# EAGLE board esp32 nfc pcb (EAGLE 9.7.0)
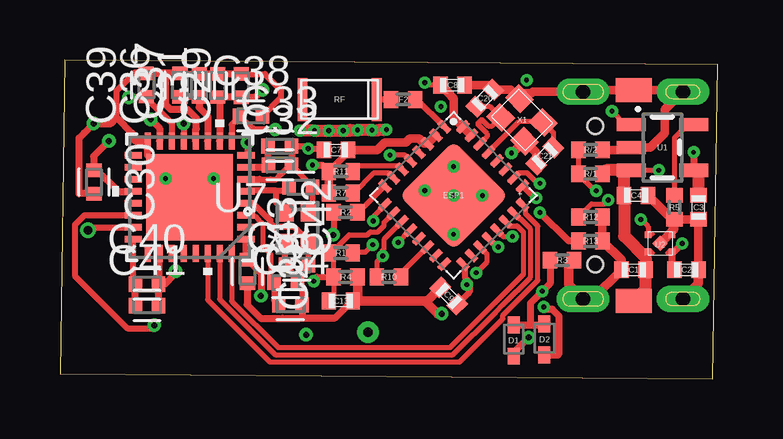
[diagram p0: board, top side]
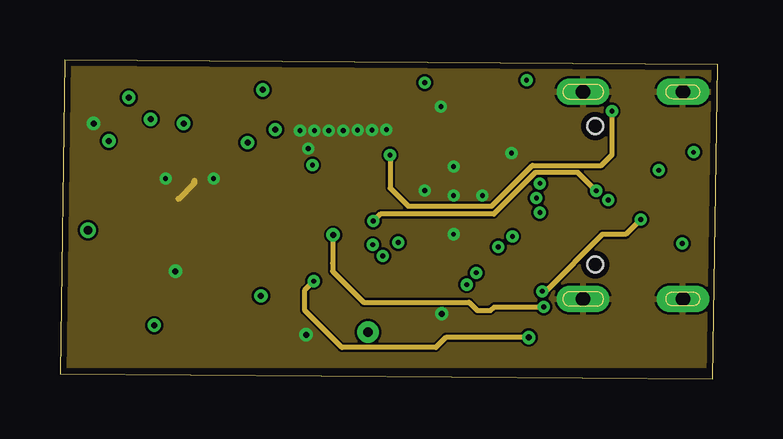
[diagram p1: board, inner layer Route2]
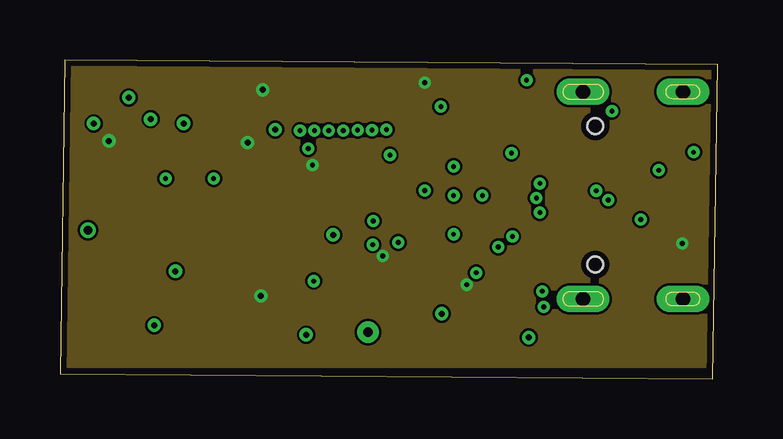
[diagram p2: board, inner layer Route14]
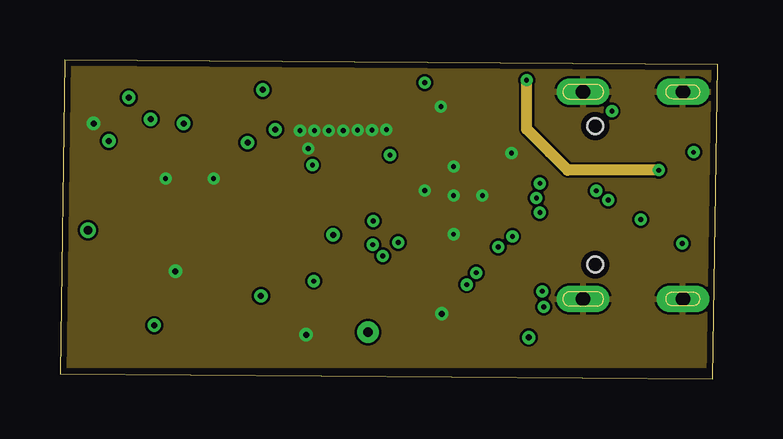
[diagram p3: board, inner layer Route15]
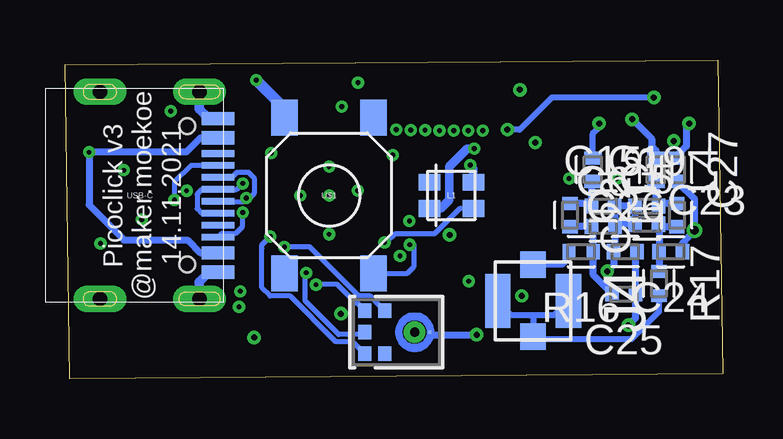
[diagram p4: board, bottom side, seen from below]

Size 27.4 x 13.3 mm. Coordinates in mm from the lower left corner, seen from the top.
Outline: 0.2,13.3 0,0.2 27.2,0 27.4,13.1 0.2,13.3
Copper layers (1+2*15+16): Top 0.035mm / dielectric 0.2mm / Route2 0.0175mm / dielectric 0.265mm / Route15 0.0175mm / dielectric 0.2mm / Bottom 0.035mm
Design rules "2020.08.24_4layers_eagle *": minimum track width 6mil, minimum drill 0.2mm, track to track 0.1mm, track to pad 0.1mm, pad to pad 0.1mm, via to via 0.1mm, smd to smd 0.1mm, copper to edge 10mil, drill to drill 6mil, minimum pad ring 10mil, minimum via ring 6mil, stop-mask expansion 0mil, vias tented up to drill 0.5mm, thermal gap 4mil

## Footprints (pad centres in the part's own frame; a part is rotated, then mirrored left to right if it is on the bottom)
SOLDERPAD_1.5X1.0 = smd 1 x 1.5: 1 0,0
C0402_S = smd 0.6 x 0.7: P$1 -0.5,0; P$2 0.5,0
CAPC1005X60 = smd 0.56 x 0.629: 1 -0.485,0; 2 0.485,0
SOD523 = smd 0.7 x 0.5: A 0.7,0; C -0.6,0
QFN32 = smd 0.6 x 0.275: 1 -2.3,1.75; 2 -2.3,1.25; 3 -2.3,0.75; 4 -2.3,0.25; 5 -2.3,-0.25; 6 -2.3,-0.75; 7 -2.3,-1.25; 8 -2.3,-1.75; 17 2.3,-1.75; 18 2.3,-1.25; 19 2.3,-0.75; 20 2.3,-0.25; 21 2.3,0.25; 22 2.3,0.75; 23 2.3,1.25; 24 2.3,1.75 | smd 0.275 x 0.6: 9 -1.75,-2.3; 10 -1.25,-2.3; 11 -0.75,-2.3; 12 -0.25,-2.3; 13 0.25,-2.3; 14 0.75,-2.3; 15 1.25,-2.3; 16 1.75,-2.3; 25 1.75,2.3; 26 1.25,2.3; 27 0.75,2.3; 28 0.25,2.3; 29 -0.25,2.3; 30 -0.75,2.3; 31 -1.25,2.3; 32 -1.75,2.3 | smd 3.2 x 3.2: EXP 0,0
R0402 = smd 0.6 x 0.7: 1 -0.5,0; 2 0.5,0
A-1JB = smd 1.1 x 1.05: 1 1.5,0; 2_1 -1.5,0 | smd 2.25 x 1.05: 2_0 0,1.475; 2_2 0,-1.475
WS2812_2020 = smd 0.9 x 0.7: DI -0.915,0.55; DO 0.915,-0.55; GND 0.915,0.55; VDD -0.915,-0.55
INDC1006X60N = smd 0.56 x 0.729: 1 -0.485,0; 2 0.485,0
SPH0645LM4H-B_KNO = smd 0.533 x 0.61: 1 1.31,0.9; 2 0.489,0.889; 4 0.489,-0.889; 5 1.31,-0.9; 6 1.31,0 | smd 0.127 x 0.127: 3 -1.397,0 | drill 0.381 pad 0.381: 7 -0.763,0
RESC1005X40 = smd 0.535 x 0.644: 1 -0.507,0; 2 0.507,0
ANT3216LL00R2400A = smd 1.8 x 0.4: P1 0,1.55; P2 0,-1.55
SOT23-5 = smd 0.55 x 1.2: 1 -0.95,-1.3; 2 0,-1.3; 3 0.95,-1.3; 4 0.95,1.3; 5 -0.95,1.3
TDFN4 = smd 0.48 x 0.48 rotated 45: EXP 0,0 | smd 0.25 x 0.3: P1 -0.35,-0.5; P2 0.35,-0.5; P3 0.35,0.5; P4 -0.35,0.5
SMD04_NX2016S_NDK = smd 0.762 x 0.838: 1 -0.525,0.675; 2 -0.525,-0.675; 3 0.525,-0.675; 4 0.525,0.675
VFQFPN32_5X5_WETTABLE_STM-L = smd 0.711 x 0.254: 1 -2.349,1.75; 2 -2.349,1.25; 3 -2.349,0.75; 4 -2.349,0.25; 5 -2.349,-0.25; 6 -2.349,-0.75; 7 -2.349,-1.25; 8 -2.349,-1.75; 17 2.349,-1.75; 18 2.349,-1.25; 19 2.349,-0.75; 20 2.349,-0.25; 21 2.349,0.25; 22 2.349,0.75; 23 2.349,1.25; 24 2.349,1.75 | smd 0.254 x 0.711: 9 -1.75,-2.349; 10 -1.25,-2.349; 11 -0.75,-2.349; 12 -0.25,-2.349; 13 0.25,-2.349; 14 0.75,-2.349; 15 1.25,-2.349; 16 1.75,-2.349; 25 1.75,2.349; 26 1.25,2.349; 27 0.75,2.349; 28 0.25,2.349; 29 -0.25,2.349; 30 -0.75,2.349; 31 -1.25,2.349; 32 -1.75,2.349 | smd 3.607 x 3.607: 33 0,0
BUTTON_ST-1187-3 = smd 1.5 x 1.1: P1 -3.25,1.85; P2 3.25,1.85; P3 -3.25,-1.85; P4 3.25,-1.85
USBC_C393939 = smd 0.55 x 1.35: A1B12 -3.2,0.775; A4B9 -2.4,0.775; B1A12 3.2,0.775; B4A9 2.4,0.775 | smd 0.275 x 1.35: A5 -1.25,0.775; A6 -0.25,0.775; A7 0.25,0.775; B5 1.75,0.775; B6 0.75,0.775; B7 -0.75,0.775; B8 1.25,0.775 | smd 0.3 x 1.35: A8 -1.75,0.775 | drill 0.6 pad 1 long: S1 -4.32,0; S2 4.32,0; S3 -4.32,-4.15; S4 4.32,-4.15 | hole 0.65: 2.89,-0.5; -2.89,-0.5
XTYL_2016 = smd 0.9 x 0.8: P1 -0.7,-0.55; P2 0.7,-0.55; P3 0.7,0.55; P4 -0.7,0.55

## Placement (x,y rotation side)
BAT+  TP/SP-1.5X1.0  [SOLDERPAD_1.5X1.0]  23.9,3.25 90 top
BAT-  TP/SP-1.5X1.0  [SOLDERPAD_1.5X1.0]  23.9,12.05 90 top
C1  1µ  [C0402_S]  23.9,4.55 0 top
C2  1µ  [C0402_S]  26.1,4.55 180 top
C3  1µ  [C0402_S]  26.6,7.15 90 top
C4  1µ  [C0402_S]  24,7.65 180 top
C5  [CAPC1005X60]  3.16,6.45 0 bottom
C6  [CAPC1005X60]  4.97,6.36 0 bottom
C7  10µ  [C0402_S]  11.5,9.55 0 top
C8  0,1µ  [C0402_S]  16.35,12.25 180 top
C9  0,1µ  [C0402_S]  16.2,3.45 315 top
C13  1µ  [C0402_S]  11.7,3.25 180 top
C15  [CAPC1005X60]  4.98,7.2 0 bottom
C19  [CAPC1005X60]  3.16,7.2 0 bottom
C20  10p  [C0402_S]  17.7,11.7 225 top
C21  10p  [C0402_S]  20.2,9.3 45 top
C22  [CAPC1005X60]  6.36,6.83 270 bottom
C23  [CAPC1005X60]  1.91,6.83 270 bottom
C24  [CAPC1005X60]  2.17,5.3 180 bottom
C25  [CAPC1005X60]  4.12,3.54 180 bottom
C26  [CAPC1005X60]  4.06,5.3 0 bottom
C27  [CAPC1005X60]  1.91,8.72 270 bottom
C28  [CAPC1005X60]  7.81,4.48 270 top
C29  [CAPC1005X60]  7.55,12.23 90 top
C30  [CAPC1005X60]  1.42,8.21 270 top
C31  [CAPC1005X60]  6.57,12.23 90 top
C32  [CAPC1005X60]  9.16,8.92 0 top
C33  [CAPC1005X60]  9.15,9.7 0 top
C34  10n  [CAPC1005X60]  9.6,3.09 0 top
C35  [CAPC1005X60]  9.41,4.01 0 top
C36  [CAPC1005X60]  5,12.24 90 top
C37  [CAPC1005X60]  5.8,12.24 90 top
C38  [CAPC1005X60]  7.95,10.96 0 top
C39  [CAPC1005X60]  3.6,12.25 90 top
C40  [CAPC1005X60]  3.62,3.95 0 top
C41  [CAPC1005X60]  3.62,3.05 0 top
C42  [CAPC1005X60]  10.04,7.99 180 top
C43  [CAPC1005X60]  9.87,4.74 0 top
D1  4148  [SOD523]  18.9,1.65 270 top
D2  4148  [SOD523]  20.19,1.69 270 top
ESP1  ESP32_C3_QFN32  [QFN32]  16.4,7.65 315 top
F2  0  [R0402]  14.3,11.65 180 top
J4  UMC-JACK  [A-1JB]  7.9,3.25 90 bottom
L1  WS2812_2020  [WS2812_2020]  11.3,7.65 180 bottom
L3  [INDC1006X60N]  5.41,8.72 270 bottom
L4  [INDC1006X60N]  2.78,8.72 270 bottom
MIC1  SPH0645LM4H-BSPH0645LM4H-B_KNO  [SPH0645LM4H-B_KNO]  13.6,1.95 180 bottom
R1  1k  [R0402]  11.7,5.25 0 top
R2  1k  [R0402]  11.9,6.95 0 top
R3  1M  [R0402]  20.92,4.95 180 top
R4  10k  [R0402]  11.9,4.25 180 top
R5  47.5k  [R0402]  25.6,7.15 270 top
R7  10k  [R0402]  11.7,7.75 0 top
R10  10k  [R0402]  13.7,4.25 0 top
R11  10k  [R0402]  11.7,8.65 0 top
R12  5.1k  [R0402]  22.1,6.75 0 top
R13  5.1k  [R0402]  22.1,5.75 0 top
R16  [RESC1005X40]  5.9,5.3 180 bottom
R17  [RESC1005X40]  2.66,3.97 270 bottom
R/1  1M  [R0402]  22.1,8.55 180 top
R/2  250k  [R0402]  22.1,9.55 0 top
RF  ANT3216LL00R2400A  [ANT3216LL00R2400A]  11.65,11.65 270 top
U1  BRCL4054BME  [SOT23-5]  25.1,9.65 270 top
U2  MIC5504  [TDFN4]  25,5.65 90 top
U3  NX2016SA-27.12MHZ-EXS00A-CS113SMD04_NX2016S_NDK  [SMD04_NX2016S_NDK]  9.89,6.3 0 top
U7  ST25R3916B-AQWTVFQFPN32_5X5_WETTABLE_STM-L  [VFQFPN32_5X5_WETTABLE_STM-L]  5.4,7.57 180 top
U$1  BUTTON_ST-1187-3  [BUTTON_ST-1187-3]  16.4,7.65 90 bottom
USB-C  USB_C_C393939  [USBC_C393939]  21.8,7.65 270 bottom
X1  XTAL_2016  [XTYL_2016]  19.25,10.8 315 top

## Library data of the parts
BAT+ BAT- = iml_elc
C1-C4 C7-C9 C13 C20 C21 ESP1 F2 L1 R1-R5 R7 R10-R13 R/1 R/2 RF U1 U2 U$1 USB-C X1 = moekoe
C5 C6 C15 C19 C22-C43 = Capacitor; CATEGORY: Capacitor
D1 D2 = diode
J4 = Connector; CATEGORY: RF Connectors / Coaxial Connectors; DESCRIPTION: RF Connectors / Coaxial Connectors AMC PCB JACK S/M T&R U.FL Compatible; MANUFACTURER: Amphenol RF; MPN: A-1JB; OPERATING_TEMPERATURE: 40°C TO +90°C; PART_STATUS: Active; PITCH: -; ROHS_COMPLIANCE: RoHS3 Compliant; SERIES: AMC; SUBCATEGORY: RF Connectors / Coaxial Connectors; TYPE: Jack, Male Pin, Surface Mount
L3 L4 = Inductor; CATEGORY: Inductor; SUB-CATEGORY: Fixed
MIC1 = 2024-08-21_16-21-19_Library; COPYRIGHT: Copyright (C) 2024 Ultra Librarian. All rights reserved.; MANUFACTURER_PART_NUMBER: SPH0645LM4H-B; MFR_NAME: Knowles
R16 R17 = Resistor; CATEGORY: Resistor; SUB-CATEGORY: Fixed
U3 = 2024-08-20_22-07-07_Library; COPYRIGHT: Copyright (C) 2024 Ultra Librarian. All rights reserved.; MANUFACTURER_PART_NUMBER: NX2016SA-27.12MHZ-EXS00A-CS11337; MFR_NAME: NDK
U7 = Library; COPYRIGHT: Copyright (C) 2024 Ultra Librarian. All rights reserved.; MANUFACTURER_PART_NUMBER: ST25R3916B-AQWT; MFR_NAME: STMicroelectronics; TYPE: RFID, RF Access, Monitoring ICs

## Nets
+3V3: C2.P$2 C7.P$2 C8.P$2 C9.P$2 C28.1 C29.1 C30.1 C31.1 ESP1.2 ESP1.3 ESP1.11 ESP1.17 ESP1.31 ESP1.32 L1.VDD MIC1.5 R7.1 R10.1 R11.1 U2.P1 U7.1 U7.8 U7.10 U7.20
+VBAT: BAT+.1 C1.P$2 C4.P$2 R/1.1 U1.3 U2.P4 U$1.P2
ADC: ESP1.9 R/1.2 R/2.1
BUTTON: C13.P$2 D1.A ESP1.10 R1.1 R4.2
DIN: ESP1.12 L1.DI
EN: ESP1.7 R7.2
EN_LDO: D1.C D2.C R3.2 U2.P3
GND: BAT-.1 C1.P$1 C2.P$1 C3.P$1 C4.P$1 C5.1 C6.2 C7.P$1 C8.P$1 C9.P$1 C13.P$1 C15.2 C19.1 C20.P$1 C21.P$1 C26.1 C27.1 C28.2 C29.2 C30.2 C31.2 C32.2 C33.2 C34.2 C35.2 C36.2 C37.2 C38.2 C39.2 C40.2 C41.2 C42.1 C43.1 ESP1.EXP L1.GND MIC1.3 R3.1 R4.1 R5.2 R12.2 R13.2 R/2.2 U1.2 U2.EXP U2.P2 U3.2 U3.4 U7.6 U7.12 U7.16 U7.26 U7.33 USB-C.A1B12 USB-C.B1A12 USB-C.S1 USB-C.S2 USB-C.S3 USB-C.S4 X1.P2 X1.P4
GPIO2: ESP1.6 R11.2
GPIO8: ESP1.14 R10.2
GPIO9: ESP1.15
GPIO10: ESP1.16
GPIO18: ESP1.25 USB-C.A7 USB-C.B7
GPIO19: ESP1.26 USB-C.A6 USB-C.B6
LATCH: ESP1.8 R2.2
MISO/SDA: ESP1.22 U7.32
MOSI: ESP1.23 U7.31
N$1: R1.2 U$1.P3
N$2: C19.2 C23.1 L4.2
N$3: C42.2 U3.1 U7.5
N$4: ESP1.1 F2.1
N$5: C15.1 C22.1 L3.2
N$6: F2.2 RF.P1
N$7: C32.1 C33.1 U7.7
N$8: C5.2 C23.2 C24.2 R17.1
N$9: C6.1 C22.2 C25.2 R16.1
N$16: D2.A R2.1
N$18: R13.1 USB-C.B5
N$23: R5.1 U1.5
N$25: R12.1 USB-C.A5
N$26: C20.P$2 ESP1.30 X1.P1
N$27: C21.P$2 ESP1.29 X1.P3
N$29: C34.1 C35.1 U7.3
N$31: C36.1 C37.1 U7.11
N$32: J4.1 R16.2
N$33: C38.1 C39.1 U7.9 U7.14
N$36: C43.2 U3.3 U7.4
N$37: J4.2_0 J4.2_1 J4.2_2 R17.2
N$38: C40.1 C41.1 U7.24
RFL1: C25.1 C26.2 U7.22
RFL2: C24.1 C27.2 U7.23
RFO1: L3.1 U7.13
RFO2: L4.1 U7.15
RX: ESP1.27
SCLK/SCL: ESP1.24 U7.30
SPICSO: ESP1.21 MIC1.1
SPIHD: ESP1.19 MIC1.6
SPIWP: ESP1.20 MIC1.4
STAT_MCP: ESP1.5 U1.1
TX: ESP1.28
VPP: C3.P$2 U1.4 USB-C.A4B9 USB-C.B4A9

## Tracks (layer width: path | path; a pad name or v marks a point on that pad's centre or on a via)
+3V3  (via drill 0.2, 0.25)
  Top 0.2: C8.P$2 15.3,12.25 v15.2,12.35 | R10.1 13.2,4.87 v13.45,5.12 13.45,5.36 13.49,5.4 13.49,5.8 ESP1.11
  Top 0.25: v7.81,9.85 7.81,9.38 U7.8 | C28.1 7.75,5.03 U7.1 | 17.08,4.02 16.87,4.23 16.87,4.71 ESP1.17 | 17.08,4.02 16.99,3.93 v16.95,3.93 | 17.08,4.02 17.08,3.65 17.02,3.58 17.02,3.56 C9.P$2
  Top 0.3: C2.P$2 25.5,4.65 U2.P1 25.57,5.3 v25.92,5.65 | v10.52,8.91 10.94,8.91 R11.1 11.9,9.35 11.9,9.55 | 6.57,11.87 C31.1 | C31.1 | 6.57,11.87 C31.1 | 6.57,11.87 6.65,11.79 | 6.65,11.79 U7.10 | 6.65,11.79 6.7,11.74 C29.1 8.13,11.74 v8.45,12.05 | v2.04,9.92 1.4,9.29 1.4,8.71 C30.1 1.56,8.69 2.4,7.85 2.43,7.82 U7.20 | v8.37,3.46 8.37,3.64 8.38,3.64 8.38,4.4 C28.1
  Top 0.35: 14.97,10.02 14.57,10.02 14.4,9.85 13.98,9.85 13.97,9.86 13.53,9.86 13.52,9.85 13.22,9.55 C7.P$2 11.9,9.55
  Top 0.352: 25.5,4.65 C2.P$2 | ESP1.31 ESP1.32 16.45,10.85 16.4,10.85 16.4,11.45 16.4,11.69 16.27,11.82 16.27,11.83 C8.P$2 | ESP1.2 ESP1.3 15.18,9.81 14.97,10.02 | R11.1 R7.1
  Bottom 0.2: MIC1.5 15.21,3.15 15.28,3.15 16.05,3.93 v16.95,3.93
  Bottom 0.35: v10.52,8.91 10.38,8.78 L1.VDD
  pour Route14: 0.35,0.6 27.25,0.6 27.25,13.1 0.35,13.1
+VBAT  (via drill 0.2)
  Top 0.2: 24,8.7 v24.95,8.7
  Top 0.3: U2.P4 24.5,4.65 C1.P$2
  Top 0.4: U1.3 24,8.7
  Top 0.5: BAT+.1 24.4,3.75 C1.P$2 24.4,5.05 23.5,5.95 C4.P$2 23.5,8.6 23.4,8.7 | 23.4,8.7 22.75,8.7 R/1.1 | U1.3 23.4,8.7
  Route15 0.45: v24.95,8.7 21.15,8.7 20.4,9.45 19.44,10.41 v19.44,12.45
  Bottom 0.45: v19.44,12.45 18.25,11.26 U$1.P2
ADC  (via drill 0.2)
  Top 0.2: R/2.1 R/1.2 22.31,7.84 v22.34,7.84 | ESP1.9 13.05,6.78 v13.05,6.58
  Route2 0.2: v13.05,6.58 13.35,6.87 18.08,6.87 19.81,8.6 21.58,8.6 v22.34,7.84
BUTTON  (via drill 0.2, 0.25)
  Top 0.2: C13.P$2 11.4,3.45 R4.2 11.4,5.05 R1.1 11.45,5.5 11.55,5.5 12.05,6 12.81,6 12.93,6.12 13.24,6.12 13.5,6.39 13.5,6.52 ESP1.10
  Top 0.25: v10.57,4.07 10.57,4.11 10.71,4.25 R4.2
  Top 0.3: v19.53,1.72 18.9,1.1 D1.A
  Route2 0.2: v10.57,4.07 10.2,3.7 10.2,2.85 11.75,1.3 15.66,1.3 16.08,1.72 v19.53,1.72
DIN  (via drill 0.2)
  Top 0.2: ESP1.12 v14.09,5.69
  Bottom 0.2: v14.09,5.69 14.01,5.69 13.65,6.05 12.01,6.05 10.96,7.1 L1.DI
EN
  Top 0.2: R7.2 12.23,7.75 13.05,8.57 13.71,8.57 ESP1.7
EN_LDO  (via drill 0.2)
  Top 0.2: U2.P3 24.5,6.35 v24.2,6.65
  Top 0.3: D2.C 20.14,2.25 19.6,2.25 | D1.C 19.6,2.25 | R3.2 20.42,3.98 v20.1,3.65 19.6,3.15 19.6,2.25
  Route2 0.2: v24.2,6.65 23.57,6.02 22.6,6.02 20.23,3.65 v20.1,3.65
GND  (via drill 0.2, 0.25)
  Top 0.2: 9.89,4.23 C35.2 | 9.6,8.92 C32.2
  Top 0.25: C29.2 8.54,12.71 9.2,12.05 9.2,11.72 C38.2 | 2.36,10.89 2.36,12.01 3.09,12.74 | C33.2 10.25,9.7 v10.35,9.6 10.95,9.6 | C40.2 4.15,3.99 U7.26 | 8.31,8.32 8.77,8.32 9,8.32 9.21,8.53 9.6,8.92 | U3.4 10.52,7.08 C42.1 10.52,8.05 C32.2 | U3.2 9.38,5.61 C43.1 9.89,4.23 C35.2 10.08,3.82 C34.2 | C36.2 C37.2
  Top 0.3: U2.P2 25.5,6.35 25.6,6.45 | C33.2 9.65,9.69 C32.2 | U7.6 8.31,8.32 | C28.2 7.8,3.08 8.36,2.52 9.27,2.52 10,2.52 | C41.2 C40.2 4.35,3.95 4.81,4.4 v4.81,4.49 | 10.95,9.6 C7.P$1 | C36.2 5,12.84 C36.2 | C37.2 | 4.2,12.74 4.4,12.74 4.4,11.44 4.61,11.23 5.32,11.23 5.68,10.87 5.68,10.43 5.65,10.4 U7.12 | C39.2 3.09,12.74 | C37.2 C31.2 C29.2 | C30.2 0.8,7.72 0.8,10.05 1,10.25 v1.4,10.65 2.13,10.65 2.36,10.89 3,10.25 3,10.05 3.13,9.92 U7.16 3.65,9.53 3.66,9.52 3.66,9.31 U7.33 | C13.P$1 12.17,3.25 11.57,2.65 11.44,2.52 10,2.52 | 4.2,12.74 C36.2 | C37.2 | C39.2 4.2,12.74 | C36.2 C39.2 | C34.2 10.08,2.61 10,2.52
  Top 0.352: C2.P$1 C3.P$1 R5.2 | R5.2 25.5,6.65 C4.P$1 | R5.2 25.6,6.45 25.6,6.25 U2.EXP | 24.2,12.05 BAT-.1 | 24.2,12.05 25.87,12.05 USB-C.S3 25.2,11.22 25.2,10.25 24.6,9.65 U1.2 23.7,9.55 R/2.2 | C1.P$1 23.4,4.95 R13.2 R12.2 | C21.P$1 19.85,9.43 X1.P2 18.85,9.41 v18.81,9.41 | 24.2,12.05 21.88,12.05 USB-C.S1 19.71,11.97 19.66,11.92 19.38,11.92 X1.P4 18.77,12.05 C20.P$1 17.86,12.25 C8.P$1
  Top 0.4: R4.1 12.4,3.45 C13.P$1 15.2,3.25 | C2.P$1 26.6,3.98 USB-C.S4 | C1.P$1 22.18,3.33 USB-C.S2 21.2,3.93 21.2,4.25 21.2,4.73 R3.1 | 15.2,3.25 15.29,3.25 C9.P$1 | v15.9,2.72 15.73,2.72 15.2,3.25
  Top 0.5: v10,10.35 v10.6,10.35 v11.2,10.35 v11.8,10.35 12.06,10.35 12.08,10.38 v12.4,10.38 | v13,10.38 | v13,10.38 13.3,10.38 13.31,10.39 v13.6,10.39 | v12.4,10.38 | v13,10.38 v12.4,10.38
  Route2 0.25: 4.94,7.51 5.6,8.17 5.6,8.25
  Bottom 0.3: 4.4,6.45 C5.1 C19.1 C15.2 4.5,6.55 4.4,6.45 | 4.4,6.45 C6.2 4.49,5.35 C26.1 4.54,4.75 v4.81,4.49 | v1.4,10.65 1.51,10.54 1.51,9.7 1.91,9.3 C27.1 | MIC1.3 12.09,1.84 v10.26,1.84
  Bottom 0.35: L1.GND 11.75,7.1 11.6,7.25 11.4,7.45 11.4,8.85 10.65,9.6 v10.35,9.6
  Bottom 0.4: USB-C.S1 21.8,11.25 21.6,11.05 21.4,10.85 USB-C.A1B12 | USB-C.S2 21.8,4.05 21.4,4.45 USB-C.B1A12
  other vias: 16.4,7.65 16.4,8.85 17.6,7.65 15.2,7.85 15.87,11.35 16.4,6.03 6.4,8.35 4.4,8.35
  pour Route2: 0.28,0.53 27.32,0.53 27.32,13.17 0.28,13.17
  pour Route15: 0.28,0.53 27.32,0.53 27.32,13.17 0.28,13.17
GPIO2
  Top 0.2: R11.2 12.43,8.88 14.11,8.88 ESP1.6
GPIO8
  Top 0.2: ESP1.14 14.2,4.39 R10.2
GPIO18  (via drill 0.2)
  Top 0.2: ESP1.25 19.76,7.55 v19.85,7.55
  Bottom 0.2: USB-C.A7 19.85,7.4 | 19.85,7.4 19.5,7.75 19.5,8.35 19.75,8.6 20.25,8.6 20.45,8.4 USB-C.B7 | 19.85,7.4 v19.85,7.55
GPIO19  (via drill 0.2)
  Top 0.2: ESP1.26 19.12,8.6 19.45,8.6 19.9,8.15 v20,8.15
  Bottom 0.2: USB-C.B6 21.7,6.9 21.9,7.1 21.9,7.7 21.7,7.9 USB-C.A6 20.25,7.9 v20,8.15
LATCH
  Top 0.2: ESP1.8 12.45,6.95 R2.2
MISO/SDA
  Top 0.2: U7.32 7.15,3.24 9.09,1.3 15.66,1.3 16.25,1.3 17.85,2.9 18.35,3.4 18.6,3.65 | ESP1.22 18.73,6.38 19.04,6.38 19.31,6.12 19.31,5.85 | 19.31,5.85 19.31,5.74 | 19.31,5.85 19.31,4.36 19.2,4.25 18.6,3.65 | 18.6,3.65 18.55,3.6
MOSI
  Top 0.2: U7.31 6.65,3.31 8.96,1 16.38,1 18.15,2.78 18.47,3.1 19.61,4.23 19.61,6.24 19.17,6.68 19.13,6.68 ESP1.23
N$1  (via drill 0.2)
  Top 0.2: R1.2 12.23,5.28 12.73,5.28 v13.04,5.59
  Bottom 0.2: U$1.P3 13.15,4.4 12.86,4.69 12.86,5.59 v13.04,5.59
N$2
  Bottom 0.3: C23.1 2.57,7.31 C19.2 2.78,7.31 L4.2
N$3
  Top 0.25: 9,7.85 9,7.37 9.37,7 U3.1 | U7.5 7.78,7.85 9,7.85 | C42.2 9.41,7.85 9,7.85
N$4
  Top 0.25: ESP1.1 14.87,11.65 F2.1
N$5
  Bottom 0.3: L3.2 5.47,8.18 C15.1 5.58,7.31 C22.1
N$6
  Top 0.25: F2.2 RF.P1
N$7
  Top 0.3: C33.1 8.68,9.69 C32.1 8.58,8.82 U7.7
N$8
  Bottom 0.3: C23.2 2.57,6.34 C5.2 2.65,6.42 C24.2 R17.1
N$9
  Bottom 0.3: C22.2 6.35,6.36 C6.1 5.39,6.29 R16.1 5.39,5.13 5.39,4.32 C25.2
N$16  (via drill 0.2, 0.25)
  Top 0.25: R2.1 11.4,6.03 v11.38,6.01 | v11.38,6.01
  Top 0.3: D2.A 20.74,0.99 20.8,1.05 20.8,2.61 20.51,2.89 20.25,2.89 v20.15,3
  Route2 0.152: v11.38,6.01 11.36,5.99
  Route2 0.2: 11.36,5.99 11.36,4.81 11.36,4.49 12.66,3.19 17.05,3.19 17.4,2.85 17.94,2.85 18.09,3 v20.15,3
N$18  (via drill 0.2)
  Top 0.3: R13.1 21.19,5.75 v20,6.94
  Bottom 0.2: 20.46,5.9 USB-C.B5 20.86,6.06 20.3,6.06 20,6.36 v20,6.94
N$23
  Top 0.2: U1.5 26.15,10.6 25.6,10.05 R5.1
N$25  (via drill 0.2)
  Top 0.2: R12.1 22.15,7.3 22.68,7.3 v22.84,7.46
  Bottom 0.2: USB-C.A5 22.15,8.9 22.84,8.21 v22.84,7.46
N$26
  Top 0.2: C20.P$2 17.93,11.35 X1.P1 18.01,10.55 17.85,10.55 17.6,10.8 17.55,10.8 17.42,10.67 17.42,10.6 17.8,10.22 17.8,10.11 ESP1.30
N$27
  Top 0.2: X1.P3 20.55,10.27 C21.P$2 | ESP1.29 19.12,10.72 20,10.72
  Top 0.35: X1.P3 20.03,10.69 20,10.72
N$29
  Top 0.2: 8.09,6.82 8.13,6.78 | 8.13,6.78 8.26,6.65 8.44,6.47 8.44,5.53 8.79,5.18 8.79,4.3 8.92,4.17 | U7.3 8.09,6.82 | 8.09,6.82 8.13,6.78
  Top 0.25: C34.1 8.92,3.28 C35.1 8.92,4.17
N$31
  Top 0.3: C36.1 5.69,11.76 5.8,11.87 | 5.8,11.87 C37.1 | C37.1 | 5.8,11.87 C37.1 | 5.8,11.87 5.8,11.32 6.15,10.97 U7.11
N$32
  Bottom 0.25: R16.2 6.41,5.04 6.6,4.85 6.7,4.75 J4.1
N$33  (via drill 0.25)
  Top 0.25: U7.9 7.15,10.6 7.2,10.65 7.47,10.92 C38.1 7.98,10.45 8,10.45 8.07,10.45 8.1,10.42 8.94,10.42 v8.97,10.39 | U7.14 4.65,10.66 3.6,11.71 C39.1 2.9,11.77 v2.86,11.73
  Bottom 0.25: v2.86,11.73 7.12,11.73 7.2,11.65 8.46,10.39 v8.97,10.39
N$36
  Top 0.25: 10.44,5.62 10.35,5.54 C43.2 | U7.4 8.05,7.32 8.76,6.61 8.76,6.49 8.92,6.33 9.75,6.33 10.44,5.64 10.44,5.62 | 10.44,5.62 U3.3 10.44,5.62
N$37
  Bottom 0.25: R17.2 2.66,2.79 3.8,1.65 7.8,1.65 J4.2_1 7.9,2.55 8,2.65 | J4.2_2 7.03,2.65 8,2.65 | 8,2.65 8.8,2.65 9.38,3.23 J4.2_0
N$38
  Top 0.25: U7.24 3.05,4.04 C40.1
  Top 0.3: C41.1 C40.1
RFL1  (via drill 0.25)
  Top 0.25: U7.22 1.01,6.82 0.62,6.42 0.62,4.29 2.8,2.11 3.81,2.11 v3.93,2.23
  Bottom 0.3: C26.2 3.64,5.24 C25.1 3.64,2.52 v3.93,2.23
RFL2  (via drill 0.35)
  Top 0.25: U7.23 1.3,6.32 v1.17,6.19
  Bottom 0.3: C27.2 1.17,7.5 v1.17,6.19 1.35,6.02 1.35,5.99 1.68,5.65 C24.1
RFO1  (via drill 0.25)
  Top 0.25: v5.15,10.65 U7.13
  Bottom 0.25: L3.1 5.41,10.24 5.4,10.25 5.15,10.5 v5.15,10.65
RFO2  (via drill 0.25)
  Top 0.3: v3.77,10.82 4.15,10.45 U7.15
  Bottom 0.3: v3.77,10.82 2.96,10.01 2.96,9.7 2.78,9.53 L4.1
SCLK/SCL
  Top 0.2: U7.30 6.15,3.3 8.75,0.7 16.07,0.7 16.65,0.7 18.45,2.5 18.45,2.65 18.6,2.8 19.91,4.11 19.91,6.37 19.4,6.87 19.4,7.12 ESP1.24
SPICSO  (via drill 0.2)
  Top 0.2: v18.85,5.93 18.47,5.93 ESP1.21
  Bottom 0.2: v18.85,5.93 19.2,5.59 19.2,5.45 19.2,3.8 18.85,3.45 18.02,3.45 16.12,1.55 15.41,1.55 MIC1.1
SPIHD  (via drill 0.2)
  Top 0.2: v17.35,4.42 17.8,4.88 17.8,5.05 17.8,5.19 ESP1.19
  Bottom 0.2: MIC1.6 15,1.85 15.6,1.85 16,1.85 17.4,3.25 17.4,4.37 v17.35,4.42
SPIWP  (via drill 0.2)
  Top 0.2: ESP1.20 18.19,5.5 v18.26,5.5
  Bottom 0.2: MIC1.4 14.44,3.19 14.44,3.2 14.69,3.45 15.15,3.45 17.21,5.5 v18.26,5.5
STAT_MCP  (via drill 0.2, 0.2 pad 0.5)
  Top 0.2: U1.1 23.56,10.6 v23,11.16 | ESP1.5 14.36,9.33 v13.75,9.33
  Route2 0.2: v23,11.16 23,9.35 22.55,8.9 19.69,8.9 17.98,7.2 14.5,7.2 13.75,7.95 v13.75,9.33
VPP  (via drill 0.2)
  Top 0.3: v26.4,9.45 | v26.4,9.45 U1.4
  Top 0.5: U1.4 26.6,8.7 C3.P$2
  Bottom 0.3: USB-C.A4B9 21.76,10.05 22.35,9.46 v26.39,9.46 v26.4,9.45 26.4,7.25 24.94,5.79 22.3,5.79 21.76,5.25 USB-C.B4A9
(copper drawn outside any net)
  shapes: Bottom area x1, Route15 area x1, Route2 area x1, Top area x1

## Text on the board
tPlace: -+
bSilkNew: Picoclick v3 / @maker.moekoe / 14.11.2021